# Altium PCB powermodule-1.PcbDoc (part 2 of 2)
Units mil, origin at the board's own origin, x right, y up, seen from the top; angles counter-clockwise.
Board outline 3937.01 x 1771.65 mil, 2 copper layers (Top, Bottom); 128 components, 96 nets, 567 pads, 424 vias.
Unrouted connection lines stored in the file: 7.
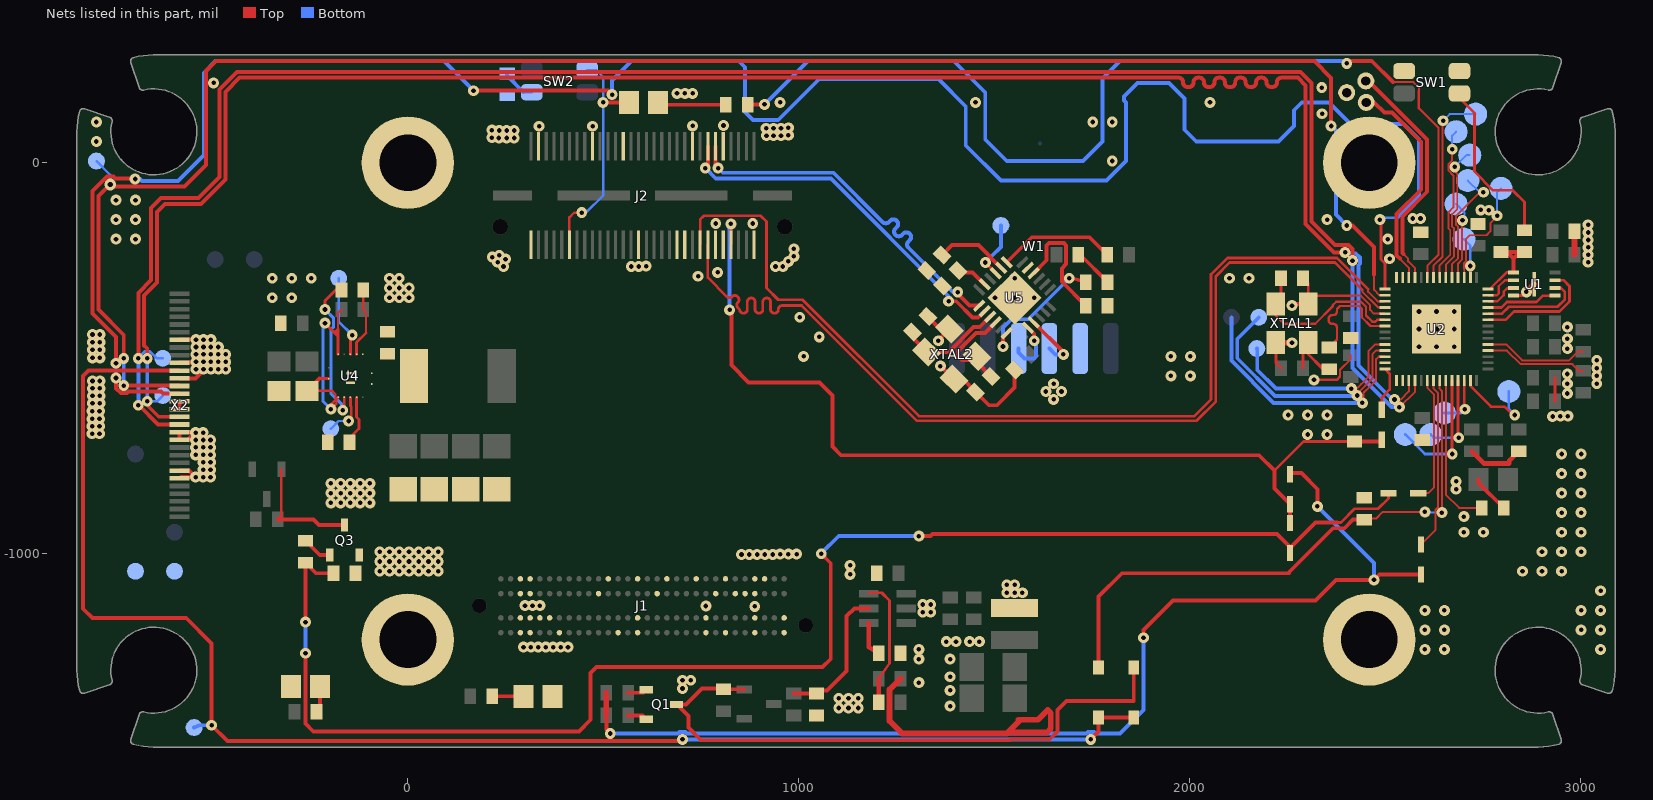
[diagram p2: the nets of this part, all layers, seen from the top]

## Via types
v1: diameter 27.81/27.81 (per signal layer), hole 11.81, Top to Bottom, 420 vias
v2: diameter 29.78/29.78 (per signal layer), hole 13.78, Top to Bottom, 4 vias

## Nets (pads, with @x,y where several pads share a name; then routed paths per layer and width w, separated by ;. In a path a pad name is that pad's centre, name@x,y a point inside that pad or via, vN(x,y) a via of type N, cw(c..) or ccw(c..) an arc to the next point about the centre after c; other vN are vias at no path point) (continued)
GND: C1.2 C3.1 C5.2 C6.2 C9.1 C13.2 C15.1 C16.2 C19.2 C23.2 C24.2 C25.2 C28.2 C29.2 C30.2 C31.2 C32.2 C33.2 C34.2 C35.2 C36.1 D10.C D11.C GND_SER.P$2 H1.P$1 H2.P$1 H3.P$1 H4.P$1 J1.A03 J1.A04 J1.A07 J1.A13 J1.A15 J1.A22 J1.A24 J1.A27 J1.A30 J1.B03 J1.B04 J1.B05 J1.B06 J1.B15 J1.B22 J1.B27 J1.B30 J1.C03 J1.C04 J1.C11 J1.C17 J1.C23 J1.C25 J1.C26 J1.C27 J1.D03 J1.D04 J1.D12 J1.D15 J1.D18 J1.D21 J1.D24 J1.D27 J1.D28 J2.1 J2.10 J2.11 J2.18 J2.21 J2.31 J2.36 J2.44 J2.58 J2.59 Q1.2 Q3.2 R8.1 R13.2 R16.1 R20.1 R24.2 R26.2 R27.2 R28.2 SW1.1 SW1.2 TP14.TP TP15.TP U1.4 U1.9 U2.19 U2.57 U2.58 U2.59 U2.60 U2.61 U2.62 U2.63 U2.64 U2.65 U2.66 U4.P$2 U4.P$3 U4.P$14 U5.25 W1.GND X2.7 X2.10 X2.12 X2.15 X2.16 X2.19 X2.20 X2.24 X2.25 XTAL1.2 XTAL1.4 XTAL2.2 XTAL2.4 | length 3301.5
  Top w5: 2384.6,-548.53 2385.6,-547.53 2385.6,-530.5 2412.8,-503.3 2412.8,-492.61 ; 2417.8,-340.24 2438.93,-340.24 2462.89,-364.2 2462.89,-376.7 2472.42,-386.23 U2.19@2500.8,-386.23
  Top w6: C24.2@-257.71,-583.8 -194.01,-583.8 -185.39,-592.42 -185.39,-607.42 ; v1(-197.2,-630.61) -182.89,-616.3 -182.89,-604.92 ; -178.7,-444.11 -178.7,-384.11 -170.2,-375.61
  Top w7: -226.41,-552.5 U4.P$2@-202.32,-552.5 ; v1(-197.2,-630.61) -197.2,-619.23 -185.39,-607.42 -182.89,-604.92 U4.P$3@-178.7,-600.73 ; U4.P$14@-178.7,-490.49 -178.7,-444.11 ; XTAL1.2@2221.8,-460.61 2221.8,-512.61 2234.8,-525.61 ; C9.1@2290.8,-295.61 2304.3,-309.11 XTAL1.4@2304.3,-361.11 ; XTAL1.4@2302.8,-361.11 2323.67,-340.24 2417.8,-340.24 ; v1(2319.17,-555.61) 2377.52,-555.61 2384.6,-548.53 ; v1@2736.8,-129.61 v1(2745.8,-120.61) ; 2935.8,-610.61 2935.8,-550.61
  Top w8: v1(-212.2,-410.61) -187.2,-435.61 ; U1.4@2829.74,-340.14 2853.27,-340.14 v1(2862.8,-330.61) ; -187.2,-435.61 -187.2,-434.11 -178.7,-425.61 -178.7,-444.11 -187.2,-435.61
  Top w10: X2.25@-584.25,-807.62 -581.24,-804.61 v1(-543.2,-804.61) -559.88,-787.93 X2.24@-584.25,-787.93 ; X2.16@-584.25,-630.45 X2.15@-584.25,-610.77 ; X2.12@-584.25,-551.71 -543.3,-551.71 -523.2,-531.61 v1(-523.2,-528.61) ; X2.10@-584.25,-512.34 -583.34,-511.44 -553.32,-511.44 -551.5,-509.61 v1(-523.2,-509.61) ; X2.7@-584.25,-453.29 -583.57,-452.61 v1(-542.2,-452.61) ; v1(-543.2,-690.61) v1@-544.3,-689.51 ; C24.2@-257.71,-583.8 -226.41,-552.5 ; 563.8,-1414.61 600.8,-1414.61 Q1.2@610.3,-1424.11 ; C36.1@1325.3,-399.11 C36.1@1330.6,-393.81 1362.05,-425.26 XTAL2.2@1386.14,-425.26 ; v1(1357.8,-455.61) 1357.8,-453.61 XTAL2.2@1386.14,-425.26 ; v1(1362.8,-520.61) 1396.15,-553.96 1397.46,-553.96 1420.55,-553.96 C35.2@1453,-586.41 1487.2,-620.61 1507.8,-620.61 1553,-575.41 C33.2@1553,-530.41 ; XTAL2.2@1386.14,-432.27 XTAL2.2@1386.14,-425.26 ; C32.2@1715.8,-235.61 1720.8,-235.61 R27.2@1790.8,-305.61 ; v1(2262.8,-365.61) 2267.3,-361.11 2302.8,-361.11 XTAL1.4@2304.3,-361.11 ; v1@-544.3,-689.51 -563.99,-709.19 X2.20@-584.25,-709.19 X2.19@-584.25,-689.51 v1@-544.3,-689.51
  Top w12: 2722.8,-738.61 2753.8,-769.61 2819.14,-769.61 2819.14,-762.27 C13.2@2842.8,-738.61
  Top w15: 1260.8,-1320.61 1232.8,-1348.61 1232.8,-1428.42 1264.99,-1460.61 1532.8,-1460.61 1535.3,-1458.11 ; XTAL1.2@2221.3,-460.11 2221.8,-460.61 v1(2262.8,-460.61) ; v1(2862.8,-330.61) U1.9@2882.8,-310.61 ; 2985.8,-235.61 C1.2@2985.8,-175.61 ; 1535.3,-1458.11 1635.55,-1458.11 1645.3,-1448.36 1645.3,-1408.11 1637.8,-1400.61 1612.8,-1425.61 1562.8,-1425.61 1562.8,-1430.61 1535.3,-1458.11
  Bottom w8: v1(-212.2,-410.61) -217.2,-415.61 -217.2,-610.61 v1(-197.2,-630.61)
  other v1: 1102.8,-1395.61 1127.8,-1395.61 1152.8,-1395.61 1387.8,-1390.61 1102.8,-1370.61 1127.8,-1370.61 1152.8,-1370.61 1387.8,-1350.61 702.8,-1345.61 1307.8,-1330.61 702.8,-1324.61 723.8,-1324.61 1387.8,-1315.61 1387.8,-1270.61 2602.8,-1245.61 2652.8,-1245.61 3052.8,-1245.61 295.8,-1239.61 314.8,-1239.61 333.8,-1239.61 352.8,-1239.61 371.8,-1239.61 390.8,-1239.61 409.8,-1239.61 1377.8,-1225.61 1402.8,-1225.61 1437.8,-1225.61 1462.8,-1225.61 2602.8,-1195.61 2652.8,-1195.61 3002.8,-1195.61 3052.8,-1195.61 2602.8,-1145.61 2652.8,-1145.61 3002.8,-1145.61 3052.8,-1145.61 887.8,-1135.61 762.8,-1134.61 299.8,-1133.61 318.8,-1133.61 337.8,-1133.61 3052.8,-1095.61 1131.8,-1053.61 -72.2,-1045.61 -47.2,-1045.61 -22.2,-1045.61 2.8,-1045.61 27.8,-1045.61 52.8,-1045.61 77.8,-1045.61 2852.8,-1045.61 2902.8,-1045.61 2952.8,-1045.61 1131.8,-1030.61 -72.2,-1020.61 -47.2,-1020.61 -22.2,-1020.61 2.8,-1020.61 27.8,-1020.61 52.8,-1020.61 77.8,-1020.61 853.8,-1002.61 873.8,-1002.61 893.8,-1002.61 913.8,-1002.61 933.8,-1002.61 952.8,-1001.61 973.8,-1001.61 994.8,-1001.61 -72.2,-995.61 -47.2,-995.61 -22.2,-995.61 2.8,-995.61 27.8,-995.61 52.8,-995.61 77.8,-995.61 2902.8,-995.61 2952.8,-995.61 3002.8,-995.61 2702.8,-945.61 2752.8,-945.61 2952.8,-945.61 3002.8,-945.61 2702.8,-905.61 2952.8,-895.61 3002.8,-895.61 -197.2,-870.61 -172.2,-870.61 -147.2,-870.61 -122.2,-870.61 -97.2,-870.61 -197.2,-845.61 -172.2,-845.61 -147.2,-845.61 -122.2,-845.61 -97.2,-845.61 2952.8,-845.61 3002.8,-845.61 2682.8,-835.61 -197.2,-820.61 -172.2,-820.61 -147.2,-820.61 -122.2,-820.61 -97.2,-820.61 2682.8,-815.61 -524.2,-804.61 -505.2,-804.61 2952.8,-795.61 3002.8,-795.61 -524.2,-785.61 -505.2,-785.61 -524.2,-766.61 -505.2,-766.61 -543.2,-747.61 -524.2,-747.61 -505.2,-747.61 2952.8,-745.61 3002.8,-745.61 -543.2,-728.61 -524.2,-728.61 -505.2,-728.61 -543.2,-709.61 -524.2,-709.61 -505.2,-709.61 2302.8,-695.61 2352.8,-695.61 -808.2,-693.61 -789.2,-693.61 -524.2,-690.61 -808.2,-674.61 -789.2,-674.61 -808.2,-655.61 -789.2,-655.61 2929.8,-649.61 2949.8,-648.61 2968.8,-648.61 2252.8,-645.61 2302.8,-645.61 2352.8,-645.61 -808.2,-635.61 -789.2,-635.61 -807.2,-615.61 -788.2,-615.61 1652.8,-605.61 -807.2,-596.61 -788.2,-596.61 2967.8,-590.61 1632.8,-585.61 1672.8,-585.61 -807.2,-577.61 -788.2,-577.61 1652.8,-565.61 2967.8,-565.61 3042.8,-565.61 -807.2,-558.61 -788.2,-558.61 1952.8,-545.61 2002.8,-545.61 3042.8,-545.61 2967.8,-540.61 -542.2,-528.61 -504.2,-528.61 -485.2,-528.61 -466.2,-528.61 3042.8,-525.61 -542.2,-509.61 -504.2,-509.61 -485.2,-509.61 -466.2,-509.61 3042.8,-505.61 -807.2,-499.61 -788.2,-499.61 1012.8,-495.61 1952.8,-495.61 2002.8,-495.61 -542.2,-490.61 -523.2,-490.61 -504.2,-490.61 -485.2,-490.61 -466.2,-490.61 -807.2,-478.61 -788.2,-478.61 2967.8,-475.61 -542.2,-471.61 -523.2,-471.61 -504.2,-471.61 -485.2,-471.61 -807.2,-459.61 -788.2,-459.61 -523.2,-452.61 -504.2,-452.61 2967.8,-450.61 1052.8,-445.61 -807.2,-439.61 -788.2,-439.61 2967.8,-420.61 1002.8,-395.61 -347.2,-345.61 -297.2,-345.61 -47.2,-345.61 -22.2,-345.61 2.8,-345.61 1502.8,-345.61 1552.8,-345.61 1602.8,-345.61 -47.2,-320.61 -22.2,-320.61 2.8,-320.61 -347.2,-295.61 -297.2,-295.61 -247.2,-295.61 -47.2,-295.61 -22.2,-295.61 1552.8,-295.61 2102.8,-295.61 2152.8,-295.61 742.8,-290.61 792.8,-280.61 244.8,-265.61 571.8,-265.61 590.8,-265.61 940.8,-265.61 959.8,-265.61 609.8,-264.61 229.8,-254.61 3020.8,-254.61 973.8,-252.61 249.8,-246.61 2512.8,-245.61 215.8,-241.61 987.8,-239.61 233.8,-236.61 3020.8,-235.61 987.8,-220.61 3020.8,-216.61 3020.8,-197.61 -747.2,-195.61 -697.2,-195.61 2507.8,-195.61 3020.8,-178.61 3020.8,-158.61 787.8,-155.61 882.8,-155.61 -747.2,-145.61 -697.2,-145.61 2352.8,-145.61 2571.8,-142.61 2591.8,-142.61 2766.8,-121.61 -747.2,-95.61 -697.2,-95.61 1802.8,4.39 -797.2,54.39 232.8,63.39 252.8,63.39 271.8,63.39 214.8,64.39 917.8,69.39 935.8,69.39 954.8,69.39 973.8,70.39 233.8,82.39 252.8,82.39 271.8,82.39 214.8,83.39 916.8,88.39 935.8,88.39 954.8,88.39 973.8,89.39 335.8,93.39 472.8,93.39 728.8,94.39 807.8,95.39 -797.2,104.39 1752.8,104.39 1802.8,104.39 2339.8,125.39 952.8,154.39 1452.8,154.39 2052.8,154.39 688.8,177.39 708.8,177.39 728.8,177.39 2338.8,192.39 -497.2,204.39
GPIO0: U2.2 XP1.P$1 | length 104.9
  Top w6: v1(2718.89,-264.29) 2719.43,-264.82 U2.2@2719.43,-293.61
  Bottom w6: XP1.P$1@2702.8,-195.61 2718.89,-211.7 v1(2718.89,-264.29)
GPIO1: U2.3 XP11.P$1 | length 293
  Top w5: U2.3@2703.68,-293.61 2703.68,-272.27 2702.49,-271.08 2702.49,-257.49 2707.8,-252.18 2707.8,-195.61 2717.8,-185.61 2760.6,-185.61 2770.6,-175.61 2770.6,-154.5 2787.8,-137.3 v1(2787.8,-135.61)
  Bottom w5: v1(2787.8,-135.61) 2787.8,-75.61 XP11.P$1@2797.8,-65.61
GPIO2: U2.4 XP2.P$1 | length 203.6
  Top w5: U2.4@2687.93,-293.61 2687.93,-257.91 2697.8,-248.04 2697.8,-148.81 v1(2699.21,-147.41)
  Bottom w5: XP2.P$1@2682.8,-105.61 2704.21,-127.02 2704.21,-142.41 v1(2699.21,-147.41)
GPIO3: U2.5 XP3.P$1 | length 313.8
  Top w5: U2.5@2672.18,-293.61 2672.18,-259.52 2687.8,-243.89 2687.8,-164.2 2682.8,-159.2 2682.8,-135.61 2742.8,-75.61 v1(2752.8,-75.61)
  Bottom w5: XP3.P$1@2712.8,-45.61 2742.8,-75.61 v1(2752.8,-75.61)
GPIO4: U2.6 XP4.P$1 | length 354.2
  Top w5: U2.6@2656.43,-293.61 2656.43,-261.13 2677.8,-239.75 2677.8,-168.34 2672.8,-163.34 2672.8,-131.47 2685.73,-118.54 2685.73,-28.54 2677.8,-20.61 2677.8,-12.02 v1(2679.21,-10.61)
  Bottom w5: v1(2679.21,-10.61) 2709.21,19.39 XP4.P$1@2717.8,19.39
GPIO5: U2.7 XP5.P$1 | length 405.3
  Top w5: U2.7@2640.68,-293.61 2640.68,-262.73 2667.8,-235.61 2667.8,-172.49 2662.8,-167.49 2662.8,-127.33 2675.73,-114.4 2675.73,-32.68 2662.8,-19.75 2662.8,-3.81 2672.8,6.19 v1(2672.8,34.39)
  Bottom w5: v1(2672.8,34.39) 2672.8,69.39 XP5.P$1@2682.8,79.39
GPIO6: U2.8 XP10.P$1 | length 501.6
  Top w5: U2.8@2624.92,-293.61 2624.93,-263.33 2648.3,-239.96 2648.3,106.31 v1(2649.59,107.6)
  Bottom w5: v1(2649.59,107.6) 2666.38,124.39 XP10.P$1@2732.8,124.39
GPIO7: R23.2 U2.9 | length 2691.6
  Top w5: 2520.88,206.31 2573.66,206.31 2587.36,192.61 2587.36,184.39 ; U2.9@2609.17,-293.61 2609.18,-264.23 2637.8,-235.61
  Top w6: 2587.36,184.39 2587.36,139.83 2637.8,89.39 2637.8,-235.61
  Top w10: R23.2@869.8,148.39 880.2,149.39 v1(912.8,149.39) ; v1(2402.8,254.39) 2408.58,260.17 2467.02,260.17 2520.88,206.31
  Bottom w10: v1(912.8,149.39) 1023.58,260.17 1397.02,260.17 1477.8,179.39 1477.8,59.39 1532.8,4.39 1727.8,4.39 1777.8,54.39 1777.8,215.17 1822.8,260.17 2397.02,260.17 v1(2402.8,254.39)
GPIO8_TX1: U2.11 X3.P$2 | length 611.5
  Top w5: 2548.41,-234 2559.87,-245.47 2559.87,-252.54 2577.93,-270.59 2577.93,-293.36 U2.11@2577.67,-293.61
  Top w10: X3.P$2@2451.8,209.39 2458.63,209.39 2524.91,143.11 2608.74,59.27 2608.74,-74.28 2545.8,-137.23 2545.8,-231.4 2548.41,-234
GPIO9_RX1: U2.12 X4.P$2 | length 568.6
  Top w5: 2538.8,-245.61 2561.93,-268.73 U2.12@2561.92,-293.61
  Top w10: X4.P$2@2452.8,154.39 2472.8,154.39 2499.08,128.11 2518.7,128.11 2593.74,53.06 2593.74,-68.07 2530.8,-131.01 2530.8,-237.61 2538.8,-245.61
GPIO10: U2.13
GPIO11: U2.14
GPIO12: U2.15 X2.14 | length 5672.2
  Top w7: v1(2487.8,-145.61) 2490.39,-148.2 2490.39,-247.82 2500.8,-258.23 U2.15@2500.8,-323.23
  Top w10: v1(-747.2,-550.93) -747.2,-577.35 -735.03,-589.52 -719.37,-589.52 -715.46,-585.61 -632.2,-585.61 -626.73,-591.08 X2.14@-584.25,-591.08 ; v1(-746.95,-513.12) -746.95,-445.86 -807.2,-385.61 -807.2,-72.48 -770.44,-35.72 -753.96,-35.72 -749.07,-40.61 -699.12,-40.61 v1(-698.03,-41.7) ; v1(167.8,184.39) 512.8,184.39 v1(522.8,174.39)
  Bottom w7: v1(2487.8,-145.61) 2492.8,-140.61 2532.8,-140.61
  Bottom w10: v1(-747.2,-550.93) -747.2,-513.37 v1(-746.95,-513.12) ; v1(-698.03,-41.7) -685.76,-41.7 -680.72,-46.75 -588.34,-46.75 -522.2,19.39 -522.2,230.17 -492.2,260.17 92.02,260.17 v1(167.8,184.39) ; v1(522.8,174.39) 522.8,210.17 572.8,260.17 847.02,260.17 862.8,244.39 862.8,129.39 882.8,109.39 947.8,109.39 1052.8,214.39 1357.8,214.39 1427.8,144.39 1427.8,44.39 1517.8,-45.61 1787.8,-45.61 1837.8,4.39 1837.8,154.39 1832.8,159.39 1832.8,169.39 1867.8,204.39 1947.8,204.39 1987.8,164.39 1987.8,84.39 2017.8,54.39 2227.8,54.39 2267.8,94.39 2267.8,134.39 2287.8,154.39 2357.8,154.39 2412.8,99.39 2547.8,99.39 2587.8,59.39 2587.8,-85.61 2532.8,-140.61
GPIO16: U2.27
GPIO18: U2.29
GPIO19: U2.30
GPIO22: D7.2 U2.34 | length 326.7
  Top w5: D7.2@2586.05,-845.61 2611.43,-845.61 2626.43,-830.61 2626.43,-593.38 2609.18,-576.13 U2.34@2609.17,-557.61
GPIO23: D4.2 U2.35 | length 442.6
  Top w5: D4.2@2592.8,-977.36 2630.02,-940.14 2630.02,-888.81 2636.43,-882.41 2636.43,-866.98 2636.43,-845.61 2636.43,-589.23 2624.93,-577.73 U2.35@2624.92,-557.61
GPIO24: C16.1 D5.2 U2.36 | length 1492.6
  Top w5: C16.1@2447.8,-913.61 2450.8,-910.61 2477.8,-910.61 2494.71,-893.7 v1(2602.8,-893.7) ; U2.36@2640.68,-557.61 2640.68,-578.48 2646.43,-584.23 v1(2646.43,-895.61)
  Top w10: D5.2@1767.8,-1291.61 1767.8,-1110.61 1827.8,-1050.61 2252.8,-1050.61 ; 2254.8,-1050.61 2252.8,-1050.61 ; C16.1@2447.8,-913.61 2418.89,-913.61 2396.89,-935.61 2367.8,-935.61 2252.8,-1050.61
  Bottom w5: v1(2602.8,-893.7) 2604.71,-895.61 v1(2646.43,-895.61)
GPIO25: R5.2 U2.37 | length 398.2
  Top w5: U2.37@2656.43,-557.61 2656.43,-849.23 2690.8,-883.61 R5.2@2748.8,-883.61
GPIO26_ADC0: U2.38 XP6.P$1 | length 329
  Top w7: U2.38@2672.18,-557.61 2672.18,-744.95 v1(2672.83,-745.61)
  Bottom w7: XP6.P$1@2552.8,-695.61 2602.8,-745.61 v1(2672.83,-745.61)
GPIO27_ADC1: U2.39 XP7.P$1 | length 222
  Top w7: U2.39@2687.93,-557.61 2687.93,-702.1 v1(2689.58,-703.76)
  Bottom w7: XP7.P$1@2617.8,-695.61 2625.95,-703.76 v1(2689.58,-703.76)
GPIO28: D3.2 U2.28 | length 117.6
  Top w7: D3.2@2492.8,-632.36 2492.8,-600.61 2512.8,-580.61 2512.8,-539.98 U2.28@2500.8,-527.99
GPIO28_ADC2: U2.40 XP8.P$1 | length 130.5
  Top w7: U2.40@2703.68,-557.61 2703.68,-629.16 v1(2705.33,-630.82)
  Bottom w7: XP8.P$1@2652.8,-640.61 2695.54,-640.61 v1(2705.33,-630.82)
GPIO29_ADC3: U2.41 XP9.P$1 | length 224.1
  Top w7: U2.41@2719.43,-557.61 2719.43,-571.38 2772.25,-624.2 2807.01,-624.2 2828.42,-645.61 v1(2832.8,-645.61)
  Bottom w7: XP9.P$1@2817.8,-585.61 2817.8,-630.61 v1(2832.8,-645.61)
HUB_RESET: TP19.TP U5.15 | length 160.3
  Top w8: v1(1478.14,-255.27) 1504.36,-281.48 U5.15@1504.36,-283.03
  Bottom w7: 1495.3,-238.11 1502.8,-230.61
  Bottom w10: v1(1478.14,-255.27) 1495.3,-238.11 1517.8,-215.61 TP19.TP@1517.8,-160.61
N$1: R1.1 SW1.4 | length 448.2
  Top w6: SW1.4@2691.53,177.39 2691.53,165.66 2705.8,151.39
  Top w7: 2705.8,151.39 2729.8,127.39 2729.8,-22.61 2777.8,-70.61 2802.8,-70.61 2827.8,-70.61 2857.8,-100.61 R1.1@2857.8,-172.61
N$2: C26.2 L2.P$2 U4.P$8 U4.P$9 U4.P$15 U4.P$16
N$3: C25.1 U4.P$6 | length 127.4
  Top w7: C25.1@-149.2,-715.61 -149.2,-704.6 -125.21,-680.61 -125.21,-657.2 -131.45,-650.96 U4.P$6@-131.45,-600.73
N$4: R16.2 | length 367.7
  Top w10: 987.8,-1358.61 R16.2@1045.8,-1358.61 1047.2,-1350.61 1072.8,-1350.61 1122.8,-1300.61 1122.8,-1160.61 1142.8,-1140.61 1179.8,-1140.61
N$5: R18.1 | length 331.3
  Top w5: 1179.8,-1103.21 1182.4,-1100.61
  Top w7: 1182.4,-1100.61 1212.8,-1100.61 1232.8,-1120.61 1232.8,-1281.16 1204.8,-1320.61
  Top w11.81: R18.1@1204.8,-1380.61 1204.8,-1320.61
N$6: C20.1 | length 91.5
  Top w11.81: 1179.8,-1178.01 1179.8,-1240.01 C20.1@1204.8,-1255.61
N$7: R24.1 SW2.4 | length 86.4
  Bottom w6: SW2.4@296.2,180.39 SW2.4@317.07,180.39
  Bottom w10: R24.1@253.8,228.39 253.8,222.79 SW2.4@296.2,180.39
N$8: C20.2 L1.2
  other v1: 1307.8,-1270.61 1307.8,-1245.61 1317.8,-1150.61 1337.8,-1150.61 1317.8,-1130.61 1337.8,-1130.61 1532.8,-1100.61 1552.8,-1100.61 1572.8,-1100.61 1532.8,-1080.61 1552.8,-1080.61
N$9: D12.C J2.49 SW2.1 | length 596.9
  Top w6: J2.49@413.35,-209.86 413.35,-139.86 425.6,-127.61 v1(444.8,-127.61)
  Top w10: v1(499.8,154.39) D12.C@565.4,154.39
  Bottom w6: v1(444.8,-127.61) 455.8,-127.61 499.8,-83.61 v1(499.8,154.39) 499.8,219.48 481.8,237.48 SW2.1@458.8,237.48
N$10: R3.2 XTAL1.3 | length 173.9
  Top w7: 2290.8,-525.61 2290.8,-473.61 XTAL1.3@2304.3,-460.11 ; XTAL1.3@2300.2,-464.21 2300.2,-486.01 2342.8,-528.61 R3.2@2357.8,-528.61
  Top w8: XTAL1.3@2300.2,-464.21 XTAL1.3@2304.3,-460.11
N$11: R21.2 U4.P$11 | length 177.8
  Top w6: R21.2@-114.2,-325.61 -114.2,-375.61 -107.2,-382.61 -107.2,-435.61
  Top w7: U4.P$11@-131.45,-490.49 -131.45,-459.86
  Top w8: -131.45,-459.86 -107.2,-435.61
N$12: D12.A R23.1 | length 176.1
  Top w10: D12.A@640.2,154.39 646.2,148.39 R23.1@813.8,148.39
N$13: TP7.TP U4.P$12 | length 211.2
  Top w7: U4.P$12@-147.2,-490.49 -147.2,-445.92 v1(-142.46,-441.18)
  Bottom w7: TP7.TP@-177.2,-295.61 -177.2,-406.43 v1(-142.46,-441.18)
N$14: R21.1 U4.P$4 | length 392.4
  Top w7: v1@-162.95,-629.59 U4.P$4@-162.95,-600.73
  Top w8: v1(-212.2,-375.61) -212.2,-353.21 -184.6,-325.61 R21.1@-170.2,-325.61 ; v1(-166.7,-633.35) v1@-162.95,-629.59
  Bottom w8: v1(-212.2,-375.61) -190.21,-397.6 -190.21,-419.72 -197.2,-426.71 -197.2,-590.61 -166.7,-621.11 v1(-166.7,-633.35)
N$15: D11.A R22.1 | length 79.6
  Top w10: R22.1@215.8,-1365.61 D11.A@295.4,-1365.61
N$16: TP6.TP U4.P$5 | length 117.5
  Top w6: v1(-151.7,-661.11) v1@-145.71,-655.11
  Top w7: U4.P$5@-147.2,-600.73 -147.2,-622.45 -145.21,-624.44 -145.21,-654.61 v1@-145.71,-655.11
  Bottom w6: TP6.TP@-197.2,-680.61 -177.7,-661.11 v1(-151.7,-661.11)
N$17: R27.1 U5.24 | length 351.3
  Top w10: v1(1523.2,-470.26) 1523.2,-445.92 U5.24@1532.65,-436.47 ; v1(1692.8,-295.61) 1701.47,-295.61 R27.1@1734.8,-305.61
  Bottom w10: v1(1523.2,-470.26) 1523.2,-422.16 1544.75,-400.61 1587.8,-400.61 v1(1692.8,-295.61)
N$19: C26.1 U4.P$10
N$20: C36.2 U5.21 XTAL2.3 | length 265.6
  Top w10: C36.2@1291,-433.41 1291,-447.5 1327.45,-483.95 1384.46,-483.95 1447.8,-420.61 1463.66,-420.61 U5.21@1490.22,-394.05
N$21: D7.1 D9.1 R12.2 R13.1 | length 3854.8
  Top w7: 2377.8,-920.61 2387.8,-920.61 2422.8,-885.61 2482.8,-885.61 2509.55,-858.86 D7.1@2509.55,-845.61
  Top w10: v1(-262.2,-1255.61) -262.2,-1435.61 -242.2,-1455.61 437.8,-1455.61 467.8,-1425.61 467.8,-1305.61 482.8,-1290.61 1061.59,-1290.61 1082.19,-1270 1082.19,-1025 v1(1057.8,-1000.61) ; v1(-262.2,-1175.61) R12.2@-262.2,-1023.61 -235.2,-1050.61 R13.1@-190.2,-1050.61 ; v1(1307.8,-955.61) 1337.8,-955.61 1342.8,-950.61 2224.55,-950.61 2257.8,-983.86 D9.1@2257.8,-998.86 2257.8,-985.61 2322.8,-920.61 2377.8,-920.61
  Bottom w10: v1(-262.2,-1255.61) v1(-262.2,-1175.61) ; v1(1057.8,-1000.61) 1102.8,-955.61 v1(1307.8,-955.61)
N$23: C35.1 U5.22 XTAL2.1 | length 264.3
  Top w10: C35.1@1492.6,-546.81 1456.15,-510.36 1456.15,-495.27 1448.14,-495.27 1437.8,-505.61 1417.8,-505.61 1407.8,-495.61 1407.8,-481.82 1454.01,-435.61 1476.94,-435.61 U5.22@1504.36,-408.19
N$24: R5.1 | length 99.7
  Top w10: 2740.4,-810.61 2740.4,-819.21 R5.1@2804.8,-883.61
N$25: D6.2 Q1.3 R11.2 | length 1577.7
  Top w10: 860.8,-1348.21 860.2,-1347.61 R11.2@807.8,-1347.61 805.8,-1345.61 752.8,-1345.61 711.8,-1386.61 Q1.3@687.3,-1386.61 688.8,-1386.61 717.8,-1415.61 717.8,-1445.61 750.3,-1478.11 1540.05,-1478.11 1542.55,-1475.61 1642.8,-1475.61 1662.8,-1455.61 1662.8,-1400.61 1685.3,-1378.11 1857.8,-1378.11 D6.2@1857.8,-1291.61
N$26: R26.1 U5.14 | length 194.6
  Top w7: R26.1@1361.04,-242.37 R26.1@1367.6,-235.81
  Top w10: R26.1@1367.6,-235.81 1392.6,-210.81 1460.43,-210.81 U5.14@1518.51,-268.89
N$27: Q1.1 | length 49.6
  Top w10: 563.8,-1356.61 602.8,-1356.61 Q1.1@610.3,-1349.11
N$28: R25.1 U5.13 | length 302.4
  Top w10: U5.13@1532.65,-254.75 1596.78,-190.61 1744.8,-190.61 R25.1@1789.8,-235.61
N$29: Q3.3 | length 308.9
  Top w6: -333.2,-912.61 -323.8,-903.21 -323.8,-784.61
  Top w10: -333.2,-912.61 -241.6,-912.61 -227.1,-927.11 Q3.3@-162.2,-927.11
N$30: D2.1 D4.1 | length 2858.5
  Top w10: 507.8,-1414.61 507.8,-1450.83 v1(517.8,-1460.83) ; v1(1882.8,-1215.61) 1882.8,-1195.61 1957.8,-1120.61 2322.8,-1120.61 2375.8,-1067.61 v1(2472.8,-1067.61) 2486.55,-1053.86 D4.1@2592.8,-1053.86 ; D2.1@2257.8,-797.36 2260.55,-794.61 2286.8,-794.61 2327.8,-835.61 v1(2327.8,-879.61)
  Top w15: 507.8,-1414.61 507.8,-1356.61
  Bottom w10: v1(517.8,-1460.83) 691.06,-1460.83 694.97,-1456.92 710.63,-1456.92 714.54,-1460.83 1736.06,-1460.83 1739.97,-1456.92 1755.63,-1456.92 1759.32,-1460.61 1822.8,-1460.61 1882.8,-1400.61 v1(1882.8,-1215.61) ; v1(2327.8,-879.61) 2472.8,-1024.61 v1(2472.8,-1067.61)
N$31: Q3.1 R12.1 | length 77.6
  Top w10: R12.1@-262.2,-967.61 -225.7,-1004.11 Q3.1@-199.7,-1004.11
N$32: D10.A R19.1 | length 68.9
  Top w10: R19.1@-234.2,-1405.61 -224.8,-1396.21 D10.A@-224.8,-1340.61
N$33: R28.1 U5.17 | length 83.2
  Top w10: R28.1@1407.6,-275.81 1412.39,-280.61 1445.37,-280.61 U5.17@1476.08,-311.32
N$34: C34.1 U5.10 | length 323.6
  Top w10: U5.10@1601.24,-283.03 1634.8,-249.47 1634.8,-211.77 1640.66,-205.91 1678.94,-205.91 1684.8,-211.77 1684.8,-259.45 1673.89,-270.36 1673.89,-304.7 C34.1@1734.8,-365.61
PRTPWR2: U5.11
QSPI_SD0: U1.5 U2.53 | length 183.6
  Top w7: U2.53@2764.8,-370.48 2798.83,-370.48 2812.8,-356.51 2888.48,-356.51 2904.86,-340.14 U1.5@2935.86,-340.14
QSPI_SD1: U1.2 U2.55 | length 91.6
  Top w6: U2.55@2764.8,-338.98 2787.64,-338.98 2792.17,-334.45 2792.17,-316.24 2807.8,-300.61 U1.2@2829.59,-300.61
  Top w7: U1.2@2829.59,-300.61 U1.2@2829.74,-300.77
QSPI_SD2: U1.3 U2.54 | length 84.2
  Top w6: U2.54@2764.8,-354.73 2788.68,-354.73 2804.37,-339.04 2804.37,-330.43 2814.34,-320.45 U1.3@2829.74,-320.45
QSPI_SD3: U1.7 U2.51 | length 310.6
  Top w7: U2.51@2764.8,-401.98 2809.45,-401.98 2830.93,-380.51 2947.54,-380.51 2973.23,-354.82 2973.23,-316.04 2957.8,-300.61 2936.01,-300.61 U1.7@2935.86,-300.77
QSPI_SLCK: U1.6 U2.52 | length 260.4
  Top w7: U2.52@2764.8,-386.23 2800.05,-386.23 2817.77,-368.51 2942.57,-368.51 2961.23,-349.85 2961.23,-330.43 2951.26,-320.45 U1.6@2935.86,-320.45
QSPI_SS: R1.2 R2.1 U1.1 U2.56 | length 252.7
  Top w6: U2.56@2764.8,-323.23 2769.18,-323.23 2811.8,-280.61 U1.1@2829.27,-280.61
  Top w7: U1.1@2829.27,-280.61 U1.1@2829.74,-281.08
  Top w10: U1.1@2829.74,-281.08 2829.74,-245.61 ; 2829.74,-245.61 2846.74,-228.61 R1.2@2857.8,-228.61 R2.1@2797.8,-228.61 2813.4,-228.61 2829.74,-244.96 2829.74,-245.61
RESET_MCU: J2.9
RESET_USB_HUB: J2.19
RUN: U2.26 | length 642.5
  Top w5: v1(2442.8,-614.61) 2442.8,-605.55 2445.85,-602.5 2445.85,-589.15 2460,-575 2460,-574.69 2478.3,-556.39 2478.3,-502.61 2484.43,-496.48 U2.26@2500.8,-496.49
  Bottom w10: 2107.8,-395.61 2107.8,-506.61 2215.8,-614.61 v1(2442.8,-614.61)
SBUS_TX: TP9.TP U2.16 X2.13 | length 4821.4
  Top w5: X2.13@-585.03,-570.61 X2.13@-584.25,-571.4 ; 2472.8,-285.61 2472.8,-325.61 2486.18,-338.98 U2.16@2500.8,-338.98
  Top w10: v1(-727.2,-570.61) X2.13@-585.03,-570.61 ; v1(-727.2,-500.61) -727.2,-440.61 -792.2,-375.61 -792.2,-85.61 v2(-762.2,-55.61) -757.2,-60.61 -572.2,-60.61 -517.2,-5.61 -517.2,234.39 -491.42,260.17 2320.3,260.17 2363.06,217.4 v1(2363.06,94.13) ; v1(2402.8,-160.61) 2417.8,-160.61 2472.8,-215.61 2472.8,-285.61
  Bottom w6: TP9.TP@-797.2,4.39 -762.2,-30.61 v2(-762.2,-55.61)
  Bottom w10: v1(-727.2,-570.61) v1(-727.2,-500.61) ; v1(2363.06,94.13) 2374.93,82.26 2374.93,-132.74 v1(2402.8,-160.61)
SCL0: TP17.TP U2.32 X2.18 | length 5020.4
  Top w5: v1(2537.8,-625.61) 2577.68,-585.73 U2.32@2577.67,-557.61
  Top w10: v1(-690.01,-620.61) -688.41,-620.61 -639.2,-669.82 X2.18@-584.25,-669.82 ; v1(-690.01,-500.61) -690.01,-333.42 -657.2,-300.61 -657.2,-115.61 -632.2,-90.61 -535.99,-90.61 -482.2,-36.82 -482.2,187.67 -437.2,232.67 2284.52,232.67 2312.8,204.39 2312.8,-150.61 2372.8,-210.61 2407.8,-210.61 2417.8,-220.61 v1(2417.8,-250.61)
  Bottom w7: v1(-690.01,-500.61) -684.61,-495.2 -684.61,-493.4 -674.41,-483.2 -659.99,-483.2 -642.58,-500.61 TP17.TP@-627.2,-500.61
  Bottom w10: v1(-690.01,-620.61) v1(-690.01,-500.61) ; v1(2417.8,-250.61) 2417.8,-525.61 2517.8,-625.61 v1(2537.8,-625.61)
SCL_VOXL: J2.13 U2.18 | length 2540
  Top w5: 2442.8,-325.61 2442.8,-329.97 2483.32,-370.48 U2.18@2500.8,-370.48
  Top w7: J2.13@767.77,-209.86 767.77,-294.21 815.98,-342.43 ccw(c822.88,-335.53) 829.77,-342.43 cw(c836.66,-349.32) 843.56,-342.43 844.69,-343.56 cw(c837.79,-350.45) 844.69,-357.35 ccw(c851.58,-364.24) 844.69,-371.13 848.91,-375.36 ccw(c858.66,-375.36) 858.66,-385.11 858.99,-385.11 ccw(c858.99,-375.36) 868.74,-375.36 868.74,-355.86 cw(c878.49,-355.86) 878.49,-346.11 878.82,-346.11 cw(c878.82,-355.86) 888.57,-355.86 888.57,-375.36 ccw(c898.32,-375.36) 898.32,-385.11 898.65,-385.11 ccw(c898.65,-375.36) 908.4,-375.36 908.4,-355.86 cw(c918.15,-355.86) 918.15,-346.11 918.47,-346.11 cw(c918.47,-355.86) 928.22,-355.86 928.22,-375.36 ccw(c937.97,-375.36) 937.97,-385.11 938.3,-385.11 ccw(c938.3,-375.36) 948.05,-375.36 cw(c957.8,-375.36) 957.8,-365.61 1007.8,-365.61 1302.8,-660.61 2017.8,-660.61 2067.8,-610.61 2067.8,-290.61 2102.8,-255.61 2372.8,-255.61 2442.8,-325.61
SDA0: TP16.TP U2.31 X2.17 | length 5025.7
  Top w5: v1(2525.04,-606.11) 2540.78,-606.11 2561.93,-584.97 U2.31@2561.92,-557.61
  Top w10: v1(-667.2,-610.61) -667.2,-620.61 -637.67,-650.14 X2.17@-584.25,-650.14 ; v1(-667.2,-500.61) -667.2,-475.61 -675.01,-467.8 -675.01,-339.63 -642.2,-306.82 -642.2,-125.61 -629.7,-113.11 -622.2,-105.61 -529.77,-105.61 -467.2,-43.04 -467.2,181.46 -430.99,217.67 1972.8,217.67 cw(c1972.8,206.42) 1984.05,206.42 1984.05,205.08 ccw(c1995.3,205.08) 1995.3,193.83 1999.49,193.83 ccw(c1999.49,205.08) 2010.74,205.08 2010.74,206.42 cw(c2021.99,206.42) 2021.99,217.67 2026.18,217.67 cw(c2026.18,206.42) 2037.43,206.42 2037.43,205.08 ccw(c2048.68,205.08) 2048.68,193.83 2052.88,193.83 ccw(c2052.88,205.08) 2064.13,205.08 2064.13,206.42 cw(c2075.38,206.42) 2075.38,217.67 2079.57,217.67 cw(c2079.57,206.42) 2090.82,206.42 2090.82,205.08 ccw(c2102.07,205.08) 2102.07,193.83 2106.26,193.83 ccw(c2106.26,205.08) 2117.51,205.08 2117.51,206.42 cw(c2128.76,206.42) 2128.76,217.67 2132.95,217.67 cw(c2132.95,206.42) 2144.2,206.42 2144.2,205.08 ccw(c2155.45,205.08) 2155.45,193.83 2159.65,193.83 ccw(c2159.65,205.08) 2170.9,205.08 2170.9,206.42 cw(c2182.15,206.42) 2182.15,217.67 2186.34,217.67 cw(c2186.34,206.42) 2197.59,206.42 2197.59,205.08 ccw(c2208.84,205.08) 2208.84,193.83 2213.03,193.83 ccw(c2213.03,205.08) 2224.28,205.08 2224.28,206.42 cw(c2235.53,206.42) 2235.53,217.67 2278.31,217.67 2297.8,198.18 2297.8,-156.82 2370.49,-229.52 v1(2398.89,-229.52)
  Bottom w7: v1(-667.2,-610.61) -642.2,-610.61 TP16.TP@-627.2,-595.61
  Bottom w10: v1(-667.2,-610.61) v1(-667.2,-500.61) ; v1(2398.89,-229.52) 2401.08,-231.7 2425.63,-231.7 2436.71,-242.78 2436.71,-258.44 2432.8,-262.35 2432.8,-519.4 2519.52,-606.11 v1(2525.04,-606.11)
SDA_VOXL: J2.15 U2.17 | length 2538.6
  Top w5: 2457.8,-323.64 2457.8,-330.61 2481.93,-354.73 U2.17@2500.8,-354.73
  Top w7: J2.15@748.08,-209.86 748.08,-145.33 757.8,-135.61 902.8,-135.61 917.8,-150.61 917.8,-320.61 947.8,-350.61 1009.77,-350.61 1307.77,-648.61 2012.8,-648.61 2055.8,-605.61 2055.8,-285.64 2097.83,-243.61 2377.77,-243.61 2457.8,-323.64
SW1: D5.1 D6.1 TP8.TP X2.11 | length 3892.7
  Top w10: X2.11@-584.25,-532.03 -817.74,-532.03 -831.33,-545.61 -831.33,-1141.48 -807.2,-1165.61 -567.2,-1165.61 -502.2,-1230.61 v1(-502.2,-1439.74) -462.2,-1479.74 698.89,-1479.74 v1(702.8,-1475.83) ; v1(1747.8,-1475.83) 1767.8,-1455.83 D5.1@1767.8,-1419.61 D6.1@1857.8,-1419.61
  Bottom w10: TP8.TP@-547.2,-1445.61 -533.85,-1439.74 v1(-502.2,-1439.74) ; v1(702.8,-1475.83) v1(1747.8,-1475.83)
SWCLK: SWCLK.TP U2.24 | length 487.4
  Top w5: v1(2414.79,-578.1) 2428.62,-578.1 2440,-566.72 2440,-566.41 2452.8,-553.61 2456.8,-549.61 2458.3,-548.11 2458.3,-482.31 2475.63,-464.98 U2.24@2500.8,-464.99
  Bottom w10: SWCLK.TP@2172.8,-475.61 2173.8,-476.61 2173.8,-530.18 2221.71,-578.1 v1(2414.79,-578.1)
SWDIO: SWDIO.TP U2.25 | length 633.1
  Top w5: v1(2429.45,-595.7) 2429.45,-591.41 2450,-570.86 2450,-570.55 2468.3,-552.25 2468.3,-489.61 2477.18,-480.73 U2.25@2500.8,-480.74
  Bottom w10: SWDIO.TP@2177.8,-395.61 2122.8,-450.61 2122.8,-500.4 2219.41,-597 2428.15,-597 v1(2429.45,-595.7)
USB-WIFI_N: U5.2 W1.USB-DM | length 145.8
  Top w10: U5.2@1587.09,-422.33 1603.12,-438.36 v1(1603.12,-455.61)
  Bottom w10: W1.USB-DM@1563.04,-475.61 1563.04,-485.85 1577.8,-500.61 1602.8,-500.61 1608.12,-495.29 1608.12,-460.61 v1(1603.12,-455.61) v1@1602.8,-455.29
USB-WIFI_P: U5.3 W1.USB-DP | length 156.4
  Top w10: U5.3@1601.24,-408.19 1677.8,-484.75 v1(1677.8,-490.61)
  Bottom w10: W1.USB-DP@1641.78,-475.61 1656.78,-490.61 v1(1677.8,-490.61)
USB_D_N: U2.46 | length 264.5
  Top w5: U2.46@2764.8,-480.74 2812.93,-480.73 2847.8,-515.61 2980.37,-515.61 2997.37,-532.61 3007.8,-532.61
USB_D_P: U2.47 | length 268.9
  Top w5: U2.47@2764.8,-464.99 2811.32,-464.98 2851.94,-505.61 2972.37,-505.61 2994.37,-483.61 3007.8,-483.61
VOXL_EN_BUCK: D2.2 D3.1 D9.2 J2.7 R8.2 | length 2455
  Top w7: v1(826.8,-156.61) v1(826.8,-156.61) J2.7@826.84,-209.86 ; 2217.8,-787.89 2292.08,-713.61 R8.2@2422.8,-713.61
  Top w10: v1(823.38,-376.61) 827.89,-381.13 827.89,-517.8 872.21,-562.11 1053.3,-562.11 1086.8,-595.61 1086.8,-726.61 1108.8,-748.61 2178.52,-748.61 2217.8,-787.89 2217.8,-833.86 D2.2@2257.8,-873.86 D9.2@2257.8,-922.36 ; R8.2@2422.8,-713.61 2488.05,-713.61 D3.1@2492.8,-708.86
  Bottom w10: v1(823.38,-376.61) 823.38,-160.03 v1(826.8,-156.61)
VOXL_USB_N: J2.12 U5.19 | length 953
  Top w10: J2.12@787.46,42.14 787.46,-13.86 v1(794.02,-13.86) ; v1(1407.2,-331.21) 1404.91,-333.5 1436.91,-365.5 1461.68,-365.5 U5.19@1461.94,-365.76
  Bottom w10: v1(794.02,-13.86) 805.77,-25.61 1089.01,-25.61 1215.18,-151.77 ccw(c1223.13,-143.81) 1231.09,-151.77 1234.7,-148.16 cw(c1242.65,-156.12) 1250.61,-148.16 1251.3,-148.86 cw(c1243.35,-156.81) 1251.3,-164.77 1247.69,-168.38 ccw(c1255.64,-176.33) 1247.69,-184.29 1248.39,-184.99 ccw(c1256.35,-177.03) 1264.3,-184.99 1267.91,-181.38 cw(c1275.87,-189.33) 1283.82,-181.38 1284.52,-182.07 cw(c1276.56,-190.02) 1284.52,-197.98 1280.91,-201.59 ccw(c1288.87,-209.54) 1280.91,-217.5 1394.61,-331.21 v1(1407.2,-331.21) v1@1406.91,-331.5
VOXL_USB_P: J2.14 U5.20 | length 953.1
  Top w10: v1(761.21,-13.86) 767.77,-13.86 J2.14@767.77,42.14 ; v1(1384,-354.41) 1403.6,-354.41 1445.36,-396.17 1459.82,-396.17 U5.20@1476.08,-379.9
  Bottom w10: v1(761.21,-13.86) 787.95,-40.61 1082.8,-40.61 1387.8,-345.61 1387.8,-350.61 v1(1384,-354.41)
XIN: C9.2 U2.20 XTAL1.1 | length 450.4
  Top w6: XTAL1.1@2221.3,-361.11 2221.3,-391.11 2242.17,-411.98 2322.51,-411.98 2366.8,-367.7 2366.8,-364.96 2376.02,-355.74 2439.58,-355.74 2452.39,-368.55 2452.39,-391.05 2468.07,-406.73 2476.68,-406.73 2481.43,-401.98 U2.20@2500.8,-401.98
  Top w7: XTAL1.1@2221.3,-361.11 2234.8,-347.61 C9.2@2234.8,-295.61
XOUT: R3.1 U2.21 | length 293.5
  Top w6: R3.1@2357.8,-472.61 2377.8,-452.61 2377.8,-421.72 ccw(c2368.55,-421.72) 2368.55,-412.47 2365.82,-412.47 cw(c2365.82,-403.22) 2356.57,-403.22 2356.57,-399.11 cw(c2365.82,-399.11) 2365.82,-389.86 2368.55,-389.86 ccw(c2368.55,-380.61) 2377.8,-380.61 2377.8,-374.52 2385.58,-366.74 2435.02,-366.74 2441.39,-373.11 2441.39,-395.61 2463.52,-417.73 U2.21@2500.8,-417.73
pads on no net: C2.1 C2.2 C4.1 C4.2 C7.1 C7.2 C8.1 C8.2 C10.1 C10.2 C11.1 C11.2 C12.1 C12.2 C14.1 C14.2 C17.1 C17.2 C18.1 C18.2 C21.1 C21.2 C22.1 C22.2 C27.1 C27.2 D1.A D1.C J1.A05 J1.A06 J1.A08 J1.A09 J1.A10 J1.A11 J1.A12 J1.A14 J1.A16 J1.A17 J1.A18 J1.A19 J1.A20 J1.A21 J1.A23 J1.A25 J1.A26 J1.A28 J1.A29 J1.B07 J1.B08 J1.B09 J1.B10 J1.B11 J1.B12 J1.B13 J1.B14 J1.B16 J1.B17 J1.B18 J1.B19 J1.B20 J1.B21 J1.B23 J1.B24 J1.B25 J1.B26 J1.B28 J1.B29 J1.C05 J1.C06 J1.C07 J1.C08 J1.C09 J1.C10 J1.C12 J1.C13 J1.C14 J1.C15 J1.C16 J1.C18 J1.C19 J1.C20 J1.C21 J1.C22 J1.C24 J1.C28 J1.C29 J1.C30 J1.D05 J1.D06 J1.D07 J1.D08 J1.D09 J1.D10 J1.D11 J1.D13 J1.D14 J1.D16 J1.D17 J1.D19 J1.D20 J1.D22 J1.D23 J1.D25 J1.D26 J1.D29 J1.D30 J2.2 J2.3 J2.4 J2.5 J2.6 J2.8 J2.16 J2.20 J2.22 J2.23 J2.24 J2.25 J2.26 J2.27 J2.28 J2.29 J2.30 J2.32 J2.33 J2.34 J2.35 J2.37 J2.38 J2.39 J2.40 J2.41 J2.42 J2.43 J2.45 J2.46 J2.47 J2.48 J2.50 J2.51 J2.52 J2.53 J2.54 J2.55 J2.56 J2.57 J2.60 J2.61 J2.62 J2.63 J2.64 Q2.1 Q2.2 Q2.3 Q4.1 Q4.2 Q4.3 R6.1 R6.2 R7.1 R7.2 R9.1 R9.2 R10.1 R10.2 R14.1 R14.2 R15.1 R15.2 R17.1 R17.2 SW1.3 SW2.2 SW2.3 TP11.TP U3.1 U3.2 U3.3 U3.4 U3.5 U3.6 U5.6 U5.7 U5.8 U5.12 U5.23 W1.IO1 W1.IO2 W1.P$1 X2.8 X2.9

## Polygon pours and split planes (outlines as drawn)
N$19 on Top "Polygon_1_Net_N$19" (solid, remove dead copper, pour order 6): -119.69,-422.61 -119.69,-505.85 -99.2,-505.85 -99.2,-456.85 -90.96,-448.61 -30.96,-448.61 -19.2,-436.85 -19.2,-399.37 -25.96,-392.61 -73.44,-392.61 -80.2,-399.37 -80.2,-409.37 -93.44,-422.61
+5V on Top "Polygon_3_Net_+5V" (solid, remove dead copper, pour order 19): 185.73,-780.61 275.73,-780.61 297.8,-802.68 297.8,-838.54 132.8,-1003.54 132.8,-1257.68 165.73,-1290.61 269.87,-1290.61 282.8,-1277.68 282.8,-1047.68 330.5,-999.98 427.8,-967.54 427.8,-708.54 384.87,-665.61 195.73,-665.61 172.8,-688.54 172.8,-767.68
+5V on Top "Polygon_2_Net_+5V" (solid, remove dead copper, pour order 26): -629.2,-822.61 -506.2,-822.61 -506.2,-954.61 -629.2,-954.61
+5V on Top "Polygon_1_Net_+5V" (solid, remove dead copper, pour order 31): -120.2,-582.61 -120.2,-773.61 275.8,-773.61 275.8,-592.61 191.56,-592.61 184.8,-599.37 184.8,-624.37 166.56,-642.61 -85.96,-642.61 -109.2,-619.37 -109.2,-582.61
N$2 on Top "Polygon_1_Net_N$2" (solid, remove dead copper, pour order 16): -157.2,-517.11 -98.65,-517.11 -89.67,-508.14 -85.7,-504.16 -85.7,-479.16 -68.65,-462.11 -52.2,-462.11 119.25,-462.11 131.3,-474.16 131.3,-617.06 119.25,-629.11 -68.65,-629.11 -80.7,-617.06 -80.7,-597.06 -94.67,-583.08 -98.65,-579.11 -170.7,-579.11 -170.7,-517.11
N$8 on Top "Polygon_5_Net_N$8" (solid, remove dead copper, pour order 12): 1488.3,-1067.5 1488.3,-1167.11 1612.91,-1167.11 1618.3,-1161.72 1618.3,-1088.5 1584.91,-1055.11 1500.69,-1055.11
N$8 on Top "Polygon_4_Net_N$8" (solid, remove dead copper, pour order 3): 1321.3,-1277.06 1321.3,-1239.16 1314.25,-1232.11 1264.3,-1232.11 1264.3,-1284.11 1314.25,-1284.11
N$8 on Top "Polygon_1_Net_N$8" (solid, remove dead copper, pour order 4): 1350.3,-1168.11 1311.76,-1168.11 1301.76,-1158.11 1255.3,-1158.11 1255.3,-1123.11 1301.76,-1123.11 1311.76,-1113.11 1350.3,-1113.11
+12V on Top "Polygon_4_Net_+12V" (solid, remove dead copper, pour order 27): -612.2,-440.61 -612.2,-318.54 -569.27,-275.61 -395.13,-275.61 -377.2,-293.54 -377.2,-337.68 -383.66,-344.15 -480.13,-440.61
+12V on Top "Polygon_3_Net_+12V" (solid, remove dead copper, pour order 37): -400.2,-442.61 -400.2,-538.61 -174.2,-538.61 -174.2,-512.61 -185.96,-512.61 -189.2,-509.37 -189.2,-442.61
+12V on Top "Polygon_1_Net_+12V" (solid, remove dead copper, pour order 14): 1448.84,-1028.11 1255.3,-1028.11 1255.3,-1118.11 1298.84,-1118.11 1308.84,-1108.11 1355.3,-1108.11 1355.3,-1116.65 1361.76,-1123.11 1473.84,-1123.11 1480.3,-1116.65 1480.3,-1059.57
+1V1 on Top "Polygon_3_Net_+1V1" (solid, remove dead copper, pour order 10): 2745.3,-463.11 2745.3,-498.11 2700.3,-498.11 2700.3,-361.65 2696.76,-358.11 2568.84,-358.11 2565.3,-361.65 2565.3,-463.11 2535.3,-463.11 2535.3,-438.11 2545.3,-438.11 2545.3,-354.57 2561.76,-338.11 2703.84,-338.11 2720.3,-354.57 2720.3,-463.11
+1V1 on Top "Polygon_2_Net_+1V1" (solid, remove dead copper, pour order 1): 2855.3,-398.11 2855.3,-443.11 2826.76,-443.11 2804.26,-420.61 2826.76,-398.11
+1V1 on Top "Polygon_1_Net_+1V1" (solid, remove dead copper, pour order 5): 2895.3,-528.11 2843.84,-528.11 2803.84,-488.11 2760.3,-488.11 2760.3,-503.11 2791.76,-503.11 2835.3,-546.65 2835.3,-566.65 2851.76,-583.11 2895.3,-583.11
+3V3 on Top "Polygon_7_Net_+3V3" (solid, remove dead copper, pour order 8): 1634.3,-1135.61 1634.3,-1214.11 1721.3,-1214.11 1721.3,-1127.11 1634.3,-1127.11
+3V3 on Top "Polygon_5_Net_+3V3" (solid, remove dead copper, pour order 25): -654.27,-721.61 -576.2,-721.61 -576.2,-773.61 -659.2,-773.61 -659.2,-726.54
+3V3 on Top "Polygon_4_Net_+3V3" (solid, remove dead copper, pour order 0): 2730.3,-274.57 2730.3,-328.11 2745.3,-328.11 2745.3,-250.02 2735.75,-269.13
+3V3 on Top "Polygon_3_Net_+3V3" (solid, remove dead copper, pour order 15): 1616.3,-1192.11 1484.3,-1192.11 1484.3,-1242.06 1504.3,-1262.06 1504.3,-1414.16 1496.35,-1422.11 1291.3,-1422.11 1291.3,-1362.11 1249.3,-1362.11 1249.3,-1407.06 1269.3,-1427.06 1269.3,-1449.11 1531.3,-1449.11 1531.3,-1422.06 1539.25,-1414.11 1584.25,-1414.11 1596.3,-1402.06 1596.3,-1252.06 1599.25,-1249.11 1616.3,-1249.11
+3V3 on Top "Polygon_2_Net_+3V3" (solid, remove dead copper, pour order 38): 2765.3,-298.11 2765.3,-458.11 2725.3,-458.11 2725.3,-351.65 2706.76,-333.11 2548.84,-333.11 2540.3,-341.65 2540.3,-433.11 2530.3,-433.11 2530.3,-468.11 2560.3,-468.11 2560.3,-493.11 2690.3,-493.11 2690.3,-508.11 2783.84,-508.11 2795.3,-519.57 2795.3,-561.65 2783.84,-573.11 2736.76,-573.11 2730.3,-566.65 2730.3,-553.11 2505.3,-553.11 2505.3,-298.11
+3V3 on Top "Polygon_1_Net_+3V3" (solid, remove dead copper, pour order 11): 2893.84,-588.11 2848.84,-588.11 2830.3,-569.57 2830.3,-554.57 2783.84,-508.11 2735.3,-508.11 2735.3,-591.65 2771.76,-628.11 2836.76,-628.11 2841.76,-633.11 2893.84,-633.11 2900.3,-626.65 2900.3,-594.57
GND on Top "Polygon_17_Net_GND" (solid, remove dead copper, pour order 29): 1266.35,-142.11 1251.35,-142.11 1097.85,-295.61 1351.35,-549.11 1501.35,-549.11 1601.35,-649.11 1954.25,-649.11 2006.3,-597.06 2006.3,-492.11 1756.3,-492.11 1756.3,-397.06 1806.3,-347.06 1806.3,-117.11 1291.35,-117.11
GND on Top "Polygon_16_Net_GND" (solid, remove dead copper, pour order 28): 2596.76,156.89 2753.84,156.89 2770.3,140.43 2770.3,-106.65 2705.3,-171.65 2705.3,-298.11 2615.3,-298.11 2615.3,138.35
GND on Top "Polygon_14_Net_GND" (solid, remove dead copper, pour order 32): 2656.3,-299.11 2499.3,-299.11 2499.3,100.89 2399.3,100.89 2399.3,257.89 2556.3,257.89 2556.3,155.84 2656.3,55.84
GND on Top "Polygon_9_Net_GND" (solid, remove dead copper, pour order 30): -900.7,-42.11 -550.7,-42.11 -550.7,307.89 2406.3,307.89 2406.3,-94.16 2506.3,-194.16 2506.3,-542.11 2606.3,-542.11 2606.3,-699.11 2451.35,-699.11 2349.3,-597.06 2349.3,-247.06 2249.3,-147.06 2249.3,102.94 2201.35,150.89 -393.7,150.89 -393.7,-97.06 -445.75,-149.11 -543.7,-149.11 -543.7,-999.11 -900.7,-999.11
GND on Top "Polygon_8_Net_GND" (solid, remove dead copper, pour order 23): 2049.3,-1499.11 2049.3,-1102.11 2791.35,-1102.11 2999.3,-894.16 2999.3,-592.11 3156.3,-592.11 3156.3,-1499.11
GND on Top "Polygon_7_Net_GND" (solid, remove dead copper, pour order 35): 719.16,-257.11 964.25,-257.11 976.3,-269.16 976.3,-322.11 1034.25,-322.11 1334.25,-622.11 1996.35,-622.11 2029.3,-589.16 2029.3,-284.16 2091.35,-222.11 2399.25,-222.11 2404.25,-227.11 2409.25,-227.11 2499.25,-317.11 2511.25,-317.11 2501.3,-327.06 2501.3,-394.06 2491.35,-384.11 2471.35,-384.11 2436.35,-349.11 2356.35,-349.11 2319.3,-312.06 2319.3,-287.06 2311.35,-279.11 2114.25,-279.11 2106.3,-287.06 2106.3,-607.06 2024.25,-689.11 1257.35,-689.11 997.35,-429.11 725.78,-429.11
GND on Top "Polygon_5_Net_GND" (solid, remove dead copper, pour order 41): 197.8,109.39 197.8,-300.61 1007.8,-300.61 1007.8,109.39
GND on Top "Polygon_4_Net_GND" (solid, remove dead copper, pour order 40): 247.8,-1045.61 247.8,-1250.61 1057.8,-1250.61 1057.8,-990.61 247.8,-990.61
GND on Top "Polygon_3_Net_GND" (solid, remove dead copper, shelved, pour order 43): -1052.2,659.39 -1052.2,-1750.61 3207.8,-1750.61 3207.8,659.39
GND on Top "Polygon_1_Net_GND" (solid, remove dead copper, pour order 39): 2914.8,-372.61 2914.8,-648.61 3102.8,-648.61 3102.8,-372.61
N$8 on Bottom "Polygon_3_Net_N$8" (solid, remove dead copper, pour order 7): 1351.3,-1157.11 1351.3,-1272.06 1334.25,-1289.11 1296.35,-1289.11 1284.3,-1277.06 1284.3,-1234.16 1296.35,-1222.11 1316.35,-1222.11 1324.3,-1214.16 1324.3,-1157.11
N$8 on Bottom "Polygon_2_Net_N$8" (solid, remove dead copper, pour order 13): 1350.3,-1168.11 1305.3,-1168.11 1305.3,-1113.11 1348.84,-1113.11 1358.84,-1123.11 1476.76,-1123.11 1490.3,-1109.57 1490.3,-1074.57 1501.76,-1063.11 1573.84,-1063.11 1595.3,-1084.57 1595.3,-1116.65 1583.84,-1128.11 1528.84,-1128.11 1503.84,-1153.11 1358.84,-1153.11 1350.3,-1161.65
+12V on Bottom "Polygon_2_Net_+12V" (solid, remove dead copper, pour order 36): -496.2,-224.61 -496.2,-314.68 -472.27,-338.61 -393.13,-338.61 -369.2,-314.68 -369.2,-224.61
+3V3 on Bottom "Polygon_8_Net_+3V3" (solid, remove dead copper, pour order 9): 1634.3,-1132.11 1634.3,-1207.06 1661.35,-1234.11 1689.25,-1234.11 1721.3,-1202.06 1721.3,-1175.61 1721.3,-1132.11
+3V3 on Bottom "Polygon_6_Net_+3V3" (solid, remove dead copper, pour order 2): -650.2,-719.61 -621.2,-719.61 -621.2,-777.61 -659.2,-777.61 -659.2,-735.75 -675.34,-719.61
GND on Bottom "Polygon_18_Net_GND" (solid, remove dead copper, pour order 24): 549.3,200.89 799.3,200.89 799.3,50.89 1399.3,50.89 1399.3,-99.11 1956.3,-99.11 1956.3,0.89 2449.3,0.89 2449.3,-199.11 2656.3,-199.11 2656.3,355.84 2604.25,407.89 549.3,407.89
GND on Bottom "Polygon_15_Net_GND" (solid, remove dead copper, pour order 33): 2600.3,104.3 2600.3,261.89 2748.84,261.89 2895.3,115.43 2895.3,-141.65 2635.2,-401.74
GND on Bottom "Polygon_13_Net_GND" (solid, remove dead copper, pour order 20): 1392.8,-190.61 1392.8,-600.61 1757.8,-600.61 1757.8,-190.61
GND on Bottom "Polygon_12_Net_GND" (solid, remove dead copper, pour order 34): 700.28,57.89 804.25,57.89 854.25,7.89 1204.25,7.89 1507.75,-295.61 1404.25,-399.11 1351.35,-399.11 1116.35,-164.11 626.27,-164.11
GND on Bottom "Polygon_11_Net_GND" (solid, remove dead copper, pour order 17): -800.7,-442.11 -568.7,-442.11 -568.7,-649.11 -800.7,-649.11
GND on Bottom "Polygon_10_Net_GND" (solid, remove dead copper, pour order 22): 1849.3,-492.11 1849.3,-649.11 2101.35,-649.11 2301.35,-849.11 2854.25,-849.11 2954.25,-749.11 3106.3,-749.11 3106.3,-292.11 3001.35,-292.11 2949.3,-344.16 2949.3,-542.11 2523.25,-542.11 2476.3,-495.16 2476.3,-192.11 2349.3,-192.11 2349.3,-542.11 2256.3,-542.11 2256.3,-342.11 2049.3,-342.11 2049.3,-492.11
GND on Bottom "Polygon_2_Net_GND" (solid, remove dead copper, shelved, pour order 42): -903.2,360.39 -903.2,-1551.61 3108.8,-1551.61 3108.8,360.39
no net on tDocu "Polygon_2_NoNet" (hatched 90Degree grid 20 track 6, pour order 18): 664.8,-928.61 664.8,-646.15 927.45,-646.15 927.45,-928.61
no net on tDocu "Polygon_1_NoNet" (hatched 90Degree grid 20 track 6, pour order 21): 1009.8,87.39 1009.8,-195.03 2393.75,-195.03 2393.75,87.39

## Keep-outs
Top:
  region: 1337.8,-975.61 1337.8,-1020.61 1342.8,-1025.61 2162.8,-1025.61 2172.8,-1015.61 2172.8,-985.61 2162.8,-975.61 1337.8,-975.61
  region: 1107.8,-875.61 2167.8,-875.61 2172.8,-880.61 2177.8,-885.61 2177.8,-925.61 1117.8,-925.61 1107.8,-915.61 1107.8,-875.61
  region: 1107.8,-775.61 2167.8,-775.61 2172.8,-780.61 2177.8,-785.61 2177.8,-825.61 1117.8,-825.61 1107.8,-815.61 1107.8,-775.61
  region: 1107.8,-675.61 2167.8,-675.61 2172.8,-680.61 2177.8,-685.61 2177.8,-725.61 1117.8,-725.61 1107.8,-715.61 1107.8,-675.61
Keep-Out Layer:
  lines w6: -847.2,-1298.76 ccw(c-650.38,-1298.77) -840.13,-1351.05 ccw(c-830.64,-1348.44) -827.53,-1357.78 -763.66,-1336.51 ccw(c-766.78,-1327.17) -757.22,-1324.83 cw(c-650.35,-1298.75) -549.41,-1255.03 -545.98,-1263.99 cw(c-650.35,-1298.76) -676.42,-1405.63 ccw(c-678.76,-1415.19) -688.1,-1412.07 -709.37,-1475.94 ccw(c-700.03,-1479.05) -702.64,-1488.54 ccw(c-650.37,-1298.76) -652.14,-1495.6 -650.35,-1495.61 2892.96,-1495.61 ccw(c2892.95,-1298.76) 2946.88,-1488.08 2946.82,-1487.96 ccw(c2942.64,-1479.05) 2951.98,-1475.94 2930.71,-1412.07 ccw(c2921.37,-1415.19) 2919.03,-1405.63 cw(c2892.96,-1298.76) 2788.59,-1263.99 2792.02,-1255.03 cw(c2892.96,-1298.75) 2999.82,-1324.83 ccw(c3009.39,-1327.17) 3006.27,-1336.51 3070.13,-1357.78 ccw(c3073.24,-1348.44) 3082.47,-1351.88 3082.5,-1351.89 ccw(c2892.96,-1298.74) 3089.81,-1298.76 3089.81,79.19 3089.06,96.32 ccw(c2892.92,79.2) 3082.79,131.29 ccw(c3073.25,128.87) 3070.13,138.21 3006.27,116.94 ccw(c3009.38,107.61) 2999.82,105.29 cw(c2892.96,79.19) 2867.42,-27.8 2858.19,-25.17 cw(c2892.95,79.19) 2918.49,186.19 2919.28,186 ccw(c2921.37,195.61) 2930.7,192.49 2951.96,256.32 ccw(c2942.63,259.48) 2945.67,268.85 ccw(c2892.96,79.2) 2892.96,276.04 -650.35,276.04 -652.14,276.04 ccw(c-650.33,79.2) -702.64,268.97 ccw(c-700.03,259.48) -709.37,256.37 -688.1,192.51 ccw(c-678.76,195.63) -676.42,186.06 cw(c-650.34,79.19) -545.98,44.43 -549.41,35.46 cw(c-650.35,79.19) -757.22,105.27 ccw(c-766.78,107.61) -763.66,116.94 -827.53,138.21 ccw(c-830.64,128.87) -840.13,131.49 ccw(c-650.34,79.21) -847.2,79.19 -847.2,-1298.76

## Other copper
Bottom:
  pour cut-out: -172.2,-510.61 -172.2,-585.61 -102.2,-585.61 -102.2,-675.61 312.8,-675.61 312.8,-415.61 -37.2,-415.61 -102.2,-480.61 -102.2,-510.61 -172.2,-510.61

## Silkscreen, mask and mechanical layers (free items; w line width, h text height)
Top Overlay:
  text ">PCB_VERSION" at 1306.51,234.74 h108.5
  text "BOOTSEL" at 2538.26,114.39 h49.6
Bottom Overlay:
  lines w6: 1913.8,-513.61 1917.8,-517.61 2163.8,-517.61 2173.8,-507.61 ; 1925.8,-394.61 2075.8,-394.61 ; 2142.8,-125.61 2142.8,-351.61 2158.8,-367.61
  text "RUN" at 2050.28,-373.56 h77.5
  text ">PCB_VERSION" at 356.8,-1370.61 h108.5
Dimension:
  lines w6: -847.2,-1298.76 ccw(c-650.38,-1298.77) -840.13,-1351.05 ccw(c-830.64,-1348.44) -827.53,-1357.78 -763.66,-1336.51 ccw(c-766.78,-1327.17) -757.22,-1324.83 cw(c-650.35,-1298.75) -549.41,-1255.03 -545.98,-1263.99 cw(c-650.35,-1298.76) -676.42,-1405.63 ccw(c-678.76,-1415.19) -688.1,-1412.07 -709.37,-1475.94 ccw(c-700.03,-1479.05) -702.64,-1488.54 ccw(c-650.37,-1298.76) -652.14,-1495.6 -650.35,-1495.61 2892.96,-1495.61 ccw(c2892.95,-1298.76) 2946.88,-1488.08 2946.82,-1487.96 ccw(c2942.64,-1479.05) 2951.98,-1475.94 2930.71,-1412.07 ccw(c2921.37,-1415.19) 2919.03,-1405.63 cw(c2892.96,-1298.76) 2788.59,-1263.99 2792.02,-1255.03 cw(c2892.96,-1298.75) 2999.82,-1324.83 ccw(c3009.39,-1327.17) 3006.27,-1336.51 3070.13,-1357.78 ccw(c3073.24,-1348.44) 3082.47,-1351.88 3082.5,-1351.89 ccw(c2892.96,-1298.74) 3089.81,-1298.76 3089.81,79.19 3089.06,96.32 ccw(c2892.92,79.2) 3082.79,131.29 ccw(c3073.25,128.87) 3070.13,138.21 3006.27,116.94 ccw(c3009.38,107.61) 2999.82,105.29 cw(c2892.96,79.19) 2867.42,-27.8 2858.19,-25.17 cw(c2892.95,79.19) 2918.49,186.19 2919.28,186 ccw(c2921.37,195.61) 2930.7,192.49 2951.96,256.32 ccw(c2942.63,259.48) 2945.67,268.85 ccw(c2892.96,79.2) 2892.96,276.04 -650.35,276.04 -652.14,276.04 ccw(c-650.33,79.2) -702.64,268.97 ccw(c-700.03,259.48) -709.37,256.37 -688.1,192.51 ccw(c-678.76,195.63) -676.42,186.06 cw(c-650.34,79.19) -545.98,44.43 -549.41,35.46 cw(c-650.35,79.19) -757.22,105.27 ccw(c-766.78,107.61) -763.66,116.94 -827.53,138.21 ccw(c-830.64,128.87) -840.13,131.49 ccw(c-650.34,79.21) -847.2,79.19 -847.2,-1298.76
Route Tool Path:
  lines w6: 1117.8,-900.61 ccw(c1142.8,-900.61) 1142.8,-925.61 2142.8,-925.61 ccw(c2142.8,-900.61) 2167.8,-900.61 ccw(c2142.8,-900.61) 2142.8,-875.61 1142.8,-875.61 ccw(c1142.8,-900.61) 1117.8,-900.61 ; 1117.8,-800.61 ccw(c1142.8,-800.61) 1142.8,-825.61 2142.8,-825.61 ccw(c2142.8,-800.61) 2167.8,-800.61 ccw(c2142.8,-800.61) 2142.8,-775.61 1142.8,-775.61 ccw(c1142.8,-800.61) 1117.8,-800.61 ; 1117.8,-700.61 ccw(c1142.8,-700.61) 1142.8,-725.61 2142.8,-725.61 ccw(c2142.8,-700.61) 2167.8,-700.61 ccw(c2142.8,-700.61) 2142.8,-675.61 1142.8,-675.61 ccw(c1142.8,-700.61) 1117.8,-700.61 ; 1347.8,-1000.61 ccw(c1372.8,-1000.61) 1372.8,-1025.61 2142.8,-1025.61 ccw(c2142.8,-1000.61) 2167.8,-1000.61 ccw(c2142.8,-1000.61) 2142.8,-975.61 1372.8,-975.61 ccw(c1372.8,-1000.61) 1347.8,-1000.61
tDocu:
  lines w6: -847.2,-619.63 3089.81,-619.63
  lines w10: 185.48,118.56 2941.38,118.56
tPlace:
  drawing of 1851 lines, arcs and shapes, not listed
  text "Fastboot SW" at 251.23,198.09 h27.2
  text "FB" at 719.02,126.19 h62 r90
  text "HB" at 2912.8,-835.61 h62 r90
  text "3V3" at -357.2,-1385.61 h62 r90
  text "5V" at 467.8,-1400.61 h62 r90
bPlace:
  drawing of 1844 lines, arcs and shapes, not listed
  text "TX" at 2552.8,189.39 h62
  text "RX" at 2552.8,129.39 h62
  text "IO6" at 2692.8,114.39 h62
  text "IO5" at 2647.8,59.39 h62
  text "IO4" at 2682.8,-5.61 h62
  text "IO3" at 2677.8,-65.61 h62
  text "IO1" at 2923.95,-78.7 h62
  text "IO2" at 2642.8,-125.61 h62
  text "IO0" at 2667.8,-215.61 h62
  text "A3" at 2847.8,-550.61 h62
  text "A2" at 2637.8,-610.61 h62 r270
  text "A1" at 2577.8,-660.61 h62 r270
  text "A0" at 2524.28,-664.29 h62 r270
Document:
  lines w6: 235.48,-1298.76 235.48,118.56 ; 2991.38,-1298.76 2991.38,118.56

## Dimensions
2985.8,-175.61 to 3089.81,79.19 on Dimension
1912.8,274.39 to 1912.8,469.39 on tDocu
662.8,-1045.61 to 662.8,-925.61 on tFinish
452.8,-1045.61 to 667.8,-1045.61 on tFinish

## Text inside footprints (layer, text, board x,y; h text height)
Q1: Measures "0.056in/1.422mm" at 636.8,-888.61 h38.75 r270; Measures "0.119in/3.023mm" at 918.8,-1227.61 h38.75 r270; Measures "0.019in/0.483mm" at 818.8,-1227.61 h38.75 r270; Measures "0.075in/1.905mm" at 454.8,-1227.61 h38.75 r270; Measures "0.018in/0.457mm" at 676.8,-1540.61 h38.75 r270; Measures "0.099in/2.515mm" at 636.8,-1616.61 h38.75 r270; Measures "Alt 2 Padstyle: OX90Y60D30P" at 118.8,-803.61 h77.5 r270; Measures "Alt 1 Padstyle: OX60Y90D30P" at 192.8,-803.61 h77.5 r270; Measures "Bottom Padstyle: RX19Y34D0T" at 268.8,-803.61 h77.5 r270; Measures "Top Padstyle: RX19Y34D0T" at 342.8,-856.61 h77.5 r270
Q2: Measures "0.055in/1.397mm" at 886.8,-887.61 h38.75 r270; Measures "0.12in/3.048mm" at 1170.8,-1237.61 h38.75 r270; Measures "0.02in/0.508mm" at 1070.8,-1237.61 h38.75 r270; Measures "0.075in/1.9mm" at 701.8,-1249.61 h38.75 r270; Measures "0.024in/0.61mm" at 926.8,-1540.61 h38.75 r270; Measures "0.104in/2.642mm" at 886.8,-1615.61 h38.75 r270; Measures "Alt 2 Padstyle: OX90Y60D30P" at 365.8,-802.61 h77.5 r270; Measures "Alt 1 Padstyle: OX60Y90D30P" at 440.8,-802.61 h77.5 r270; Measures "Bottom Padstyle: RX20Y40D0T" at 515.8,-802.61 h77.5 r270; Measures "Top Padstyle: RX20Y40D0T" at 590.8,-855.61 h77.5 r270
Q3: Measures "0.056in/1.422mm" at -660.2,-977.61 h38.75; Measures "0.119in/3.023mm" at -321.2,-695.61 h38.75; Measures "0.019in/0.483mm" at -321.2,-795.61 h38.75; Measures "0.075in/1.905mm" at -321.2,-1159.61 h38.75; Measures "0.018in/0.457mm" at -8.2,-937.61 h38.75; Measures "0.099in/2.515mm" at 67.8,-977.61 h38.75; Measures "Alt 2 Padstyle: OX90Y60D30P" at -745.2,-1495.61 h77.5; Measures "Alt 1 Padstyle: OX60Y90D30P" at -745.2,-1421.61 h77.5; Measures "Bottom Padstyle: RX19Y34D0T" at -745.2,-1345.61 h77.5; Measures "Top Padstyle: RX19Y34D0T" at -692.2,-1271.61 h77.5
Q4: Measures "0.055in/1.397mm" at 136.8,-810.61 h38.75 r180; Measures "0.12in/3.048mm" at -213.2,-1094.61 h38.75 r180; Measures "0.02in/0.508mm" at -213.2,-994.61 h38.75 r180; Measures "0.075in/1.9mm" at -225.2,-625.61 h38.75 r180; Measures "0.024in/0.61mm" at -516.2,-850.61 h38.75 r180; Measures "0.104in/2.642mm" at -591.2,-810.61 h38.75 r180; Measures "Alt 2 Padstyle: OX90Y60D30P" at 221.8,-289.61 h77.5 r180; Measures "Alt 1 Padstyle: OX60Y90D30P" at 221.8,-364.61 h77.5 r180; Measures "Bottom Padstyle: RX20Y40D0T" at 221.8,-439.61 h77.5 r180; Measures "Top Padstyle: RX20Y40D0T" at 168.8,-514.61 h77.5 r180
SWCLK: Bottom 3D Body ">TP_SIGNAL_NAME" at 2097.8,-475.61 h61.02 r270
SWDIO: Bottom 3D Body ">TP_SIGNAL_NAME" at 2252.8,-395.61 h61.02 r90
TP4: Bottom 3D Body ">TP_SIGNAL_NAME" at -697.2,-820.61 h61.02
TP5: Bottom 3D Body ">TP_SIGNAL_NAME" at -597.2,-1020.61 h61.02
TP6: Bottom 3D Body ">TP_SIGNAL_NAME" at -197.2,-755.61 h61.02
TP7: Bottom 3D Body ">TP_SIGNAL_NAME" at -177.2,-370.61 h61.02
TP8: Bottom 3D Body ">TP_SIGNAL_NAME" at -547.2,-1520.61 h61.02
TP9: Bottom 3D Body ">TP_SIGNAL_NAME" at -797.2,-70.61 h61.02
TP11: Bottom 3D Body ">TP_SIGNAL_NAME" at 2182.8,-395.61 h61.02 r90
TP12: Bottom 3D Body ">TP_SIGNAL_NAME" at -568.2,-247.61 h61.02 r270
TP13: Bottom 3D Body ">TP_SIGNAL_NAME" at -468.2,-247.61 h61.02 r270
TP14: Bottom 3D Body ">TP_SIGNAL_NAME" at -622.2,-1045.61 h61.02 r90
TP15: Bottom 3D Body ">TP_SIGNAL_NAME" at -522.2,-1045.61 h61.02 r90
TP16: Bottom 3D Body ">TP_SIGNAL_NAME" at -552.2,-595.61 h61.02 r90
TP17: Bottom 3D Body ">TP_SIGNAL_NAME" at -552.2,-500.61 h61.02 r90
TP19: Bottom 3D Body ">TP_SIGNAL_NAME" at 1517.8,-235.61 h61.02
U1: Measures "0.118in/2.997mm" at 2723.8,-494.61 h38.75; Measures "0.079in/2.007mm" at 3055.8,-322.61 h38.75; Measures "0.02in/0.5mm" at 2459.8,-303.61 h38.75; Measures "0.02in/0.508mm" at 2685.8,-160.61 h38.75; Measures "0.118in/3mm" at 2765.8,-10.61 h38.75; Measures "Alt 2 Padstyle: OX90Y60D30P" at 2299.8,-960.61 h77.5; Measures "Alt 1 Padstyle: OX60Y90D30P" at 2299.8,-900.61 h77.5; Measures "Heat Tab Padstyle: RX8Y63D0T" at 2269.8,-780.61 h77.5; Measures "Default Padstyle: RX28Y10D0T" at 2283.8,-720.61 h77.5
U2: Measures "0.276in/7.01mm" at 2320.8,-277.61 h38.75 r270; Measures "0.276in/7.01mm" at 2620.8,157.39 h38.75 r270; Measures "0.276in/7.01mm" at 2620.8,-762.61 h38.75 r270; Measures "0.276in/7.01mm" at 2969.8,-277.61 h38.75 r270; Measures "0.02in/0.508mm" at 2894.8,-405.61 h38.75 r270; Measures "0.016in/0.4mm" at 2714.8,-687.61 h38.75 r270; Measures "Alt 2 Padstyle: OX90Y60D30P" at 1936.8,157.39 h77.5 r270; Measures "Alt 1 Padstyle: OX60Y90D30P" at 1996.8,157.39 h77.5 r270; Measures "Heat Tab Padstyle: RX126Y126D0T" at 2116.8,255.39 h77.5 r270; Measures "Default Padstyle: RX7Y28D0T" at 2176.8,150.39 h77.5 r270; tDocu "*" at 2717.8,-284.61 h77.5 r270
U5: Measures "0.161in/4.089mm" at 1847.66,-275.61 h38.75 r135; Measures "0.161in/4.089mm" at 1951.61,-727.45 h38.75 r135; Measures "0.161in/4.089mm" at 1360.47,-136.31 h38.75 r135; Measures "0.161in/4.089mm" at 1464.41,-658.86 h38.75 r135; Measures "0.02in/0.508mm" at 1460.17,-547.14 h38.75 r135; Measures "0.02in/0.508mm" at 1385.92,-218.33 h38.75 r135; Measures "Alt 2 Padstyle: OX90Y60D30P" at 2421.83,-301.06 h77.5 r135; Measures "Alt 1 Padstyle: OX60Y90D30P" at 2379.41,-343.49 h77.5 r135; Measures "Heat Tab Padstyle: RX98Y98D0T" at 2332.03,-465.82 h77.5 r135; Measures "Default Padstyle: RX10Y36D0T" at 2263.44,-482.08 h77.5 r135
XTAL1: Measures "0.047in/1.194mm" at 1723.8,-381.61 h38.75; Measures "0.13in/3.302mm" at 2633.8,-422.61 h38.75; Measures "0in/0mm" at 1940.8,-422.61 h38.75; Measures "0in/0mm" at 2433.8,-422.61 h38.75; Measures "0.102in/2.591mm" at 2103.8,-620.61 h38.75; Measures "0.037in/0.94mm" at 2147.8,-225.61 h38.75; Measures "Alternate 2 Padstyle: OX90Y60D30P" at 1550.8,-1025.61 h77.5; Measures "Alternate 1 Padstyle: OX60Y90D30P" at 1550.8,-925.61 h77.5; Measures "Outer Pad Padstyle: RX47Y59D0T" at 1603.8,-825.61 h77.5; Measures "Inner Pad Padstyle: RX47Y-4D0T" at 1596.8,-725.61 h77.5; tDocu "*" at 2203.8,-390.61 h77.5
XTAL2: Measures "0.047in/1.194mm" at 1793.44,-128.99 h38.75 r225; Measures "0.13in/3.302mm" at 1120.98,-743.46 h38.75 r225; Measures "0in/0mm" at 1611,-253.44 h38.75 r225; Measures "0in/0mm" at 1262.4,-602.04 h38.75 r225; Measures "0.102in/2.591mm" at 1355.74,-228.69 h38.75 r225; Measures "0.037in/0.94mm" at 1603.93,-539.11 h38.75 r225; Measures "Alternate 2 Padstyle: OX90Y60D30P" at 1460.39,448.72 h77.5 r225; Measures "Alternate 1 Padstyle: OX60Y90D30P" at 1531.1,378.01 h77.5 r225; Measures "Outer Pad Padstyle: RX47Y59D0T" at 1564.33,269.82 h77.5 r225; Measures "Inner Pad Padstyle: RX47Y-4D0T" at 1639.99,204.06 h77.5 r225; tDocu "*" at 1447.66,-462.03 h77.5 r225